# Altium PCB AthetiTech_PCB_V1.0.PcbDoc (part 3 of 3)
Units mm, origin at the board's own origin, x right, y up, seen from the top; angles counter-clockwise.
Board outline 50 x 35 mm, 2 copper layers (Top Layer, Bottom Layer); 161 components, 122 nets, 602 pads, 2 vias.
Unrouted connection lines stored in the file: 390.
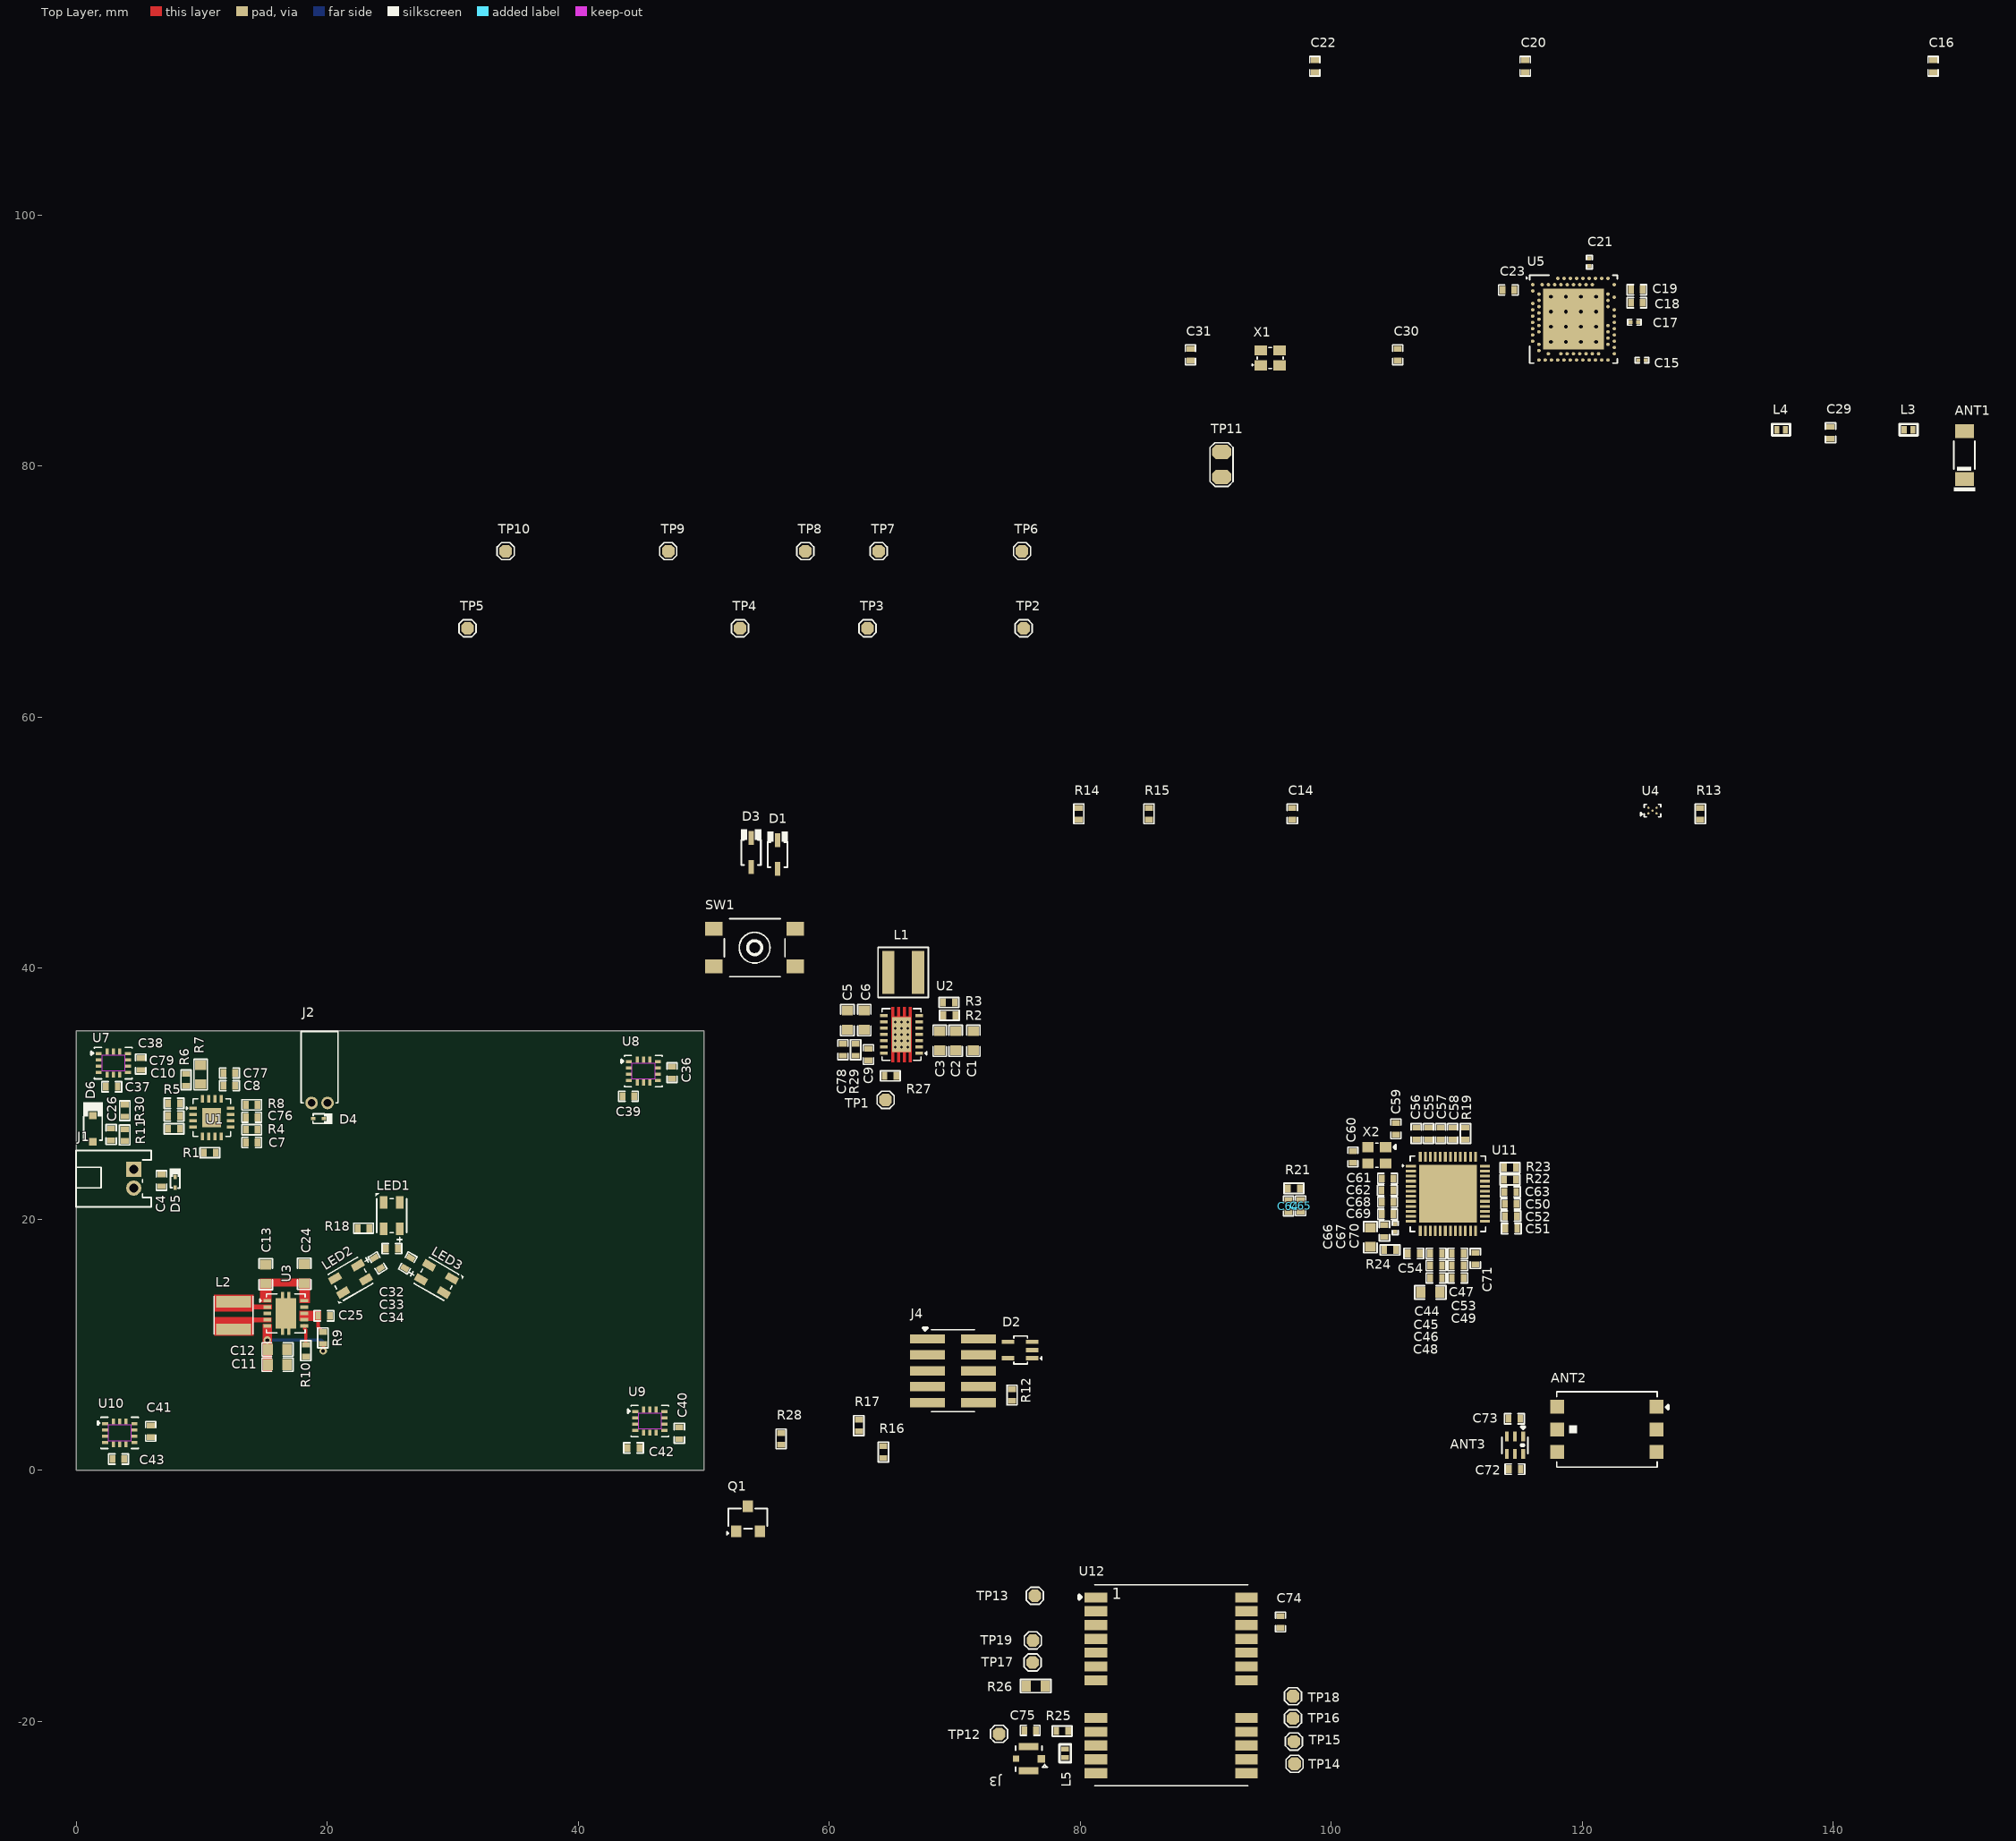
[diagram p0: Top Layer view]

## Part data (continued)
R28: library part CRCW04021K00FKEDHP, "RES SMD 1K OHM 1% 1/5W 0402", Case Code (Imperial)=0402, Case Code (Metric)=1005, LCSC Part Number=C313354, Manufacturer="Vishay Dale", Max Operating Temperature=155°C, Max Power Dissipation=125mW, Min Operating Temperature=-55°C, Package Quantity=10, Resistance=1kR, Resistance Tolerance=1%, Resistor Type="Thick Film", Supplier Part Number 1=541-1.00KYCT-ND, Temperature Coefficient=100ppm/°C, Voltage Rating=50V, Case/Package=0402, ComponentLink1Description=http://www.farnell.com/datasheets/2339608.pdf?src-supplier=Element14, ComponentLink1URL=http://www.farnell.com/datasheets/2339608.pdf?src-supplier=Element14, ComponentLink2Description=http://www.vishay.com/docs/20043/crcwhpe3.pdf?src-supplier=Digi-Key, ComponentLink2URL=http://www.vishay.com/docs/20043/crcwhpe3.pdf?src-supplier=Digi-Key, ComponentLink3Description=http://www.mouser.com/ds/2/427/crcwhpe3-46056.pdf?src-supplier=Mouser, ComponentLink3URL=http://www.mouser.com/ds/2/427/crcwhpe3-46056.pdf?src-supplier=Mouser, ComponentLink4Description=http://www.vishay.com/docs/20043/crcwhpe3.pdf?src-supplier=Avnet, ComponentLink4URL=http://www.vishay.com/docs/20043/crcwhpe3.pdf?src-supplier=Avnet, ComponentLink5Description=http://www.vishay.com/docs/20043/crcwhpe3.pdf?src-supplier=Future+Electronics, ComponentLink5URL=http://www.vishay.com/docs/20043/crcwhpe3.pdf?src-supplier=Future+Electronics, Construction=Rectangular, Contact Plating=Tin, Depth=0.5mm, Features="Automotive AEC-Q200", Height=0.3mm, Lead Free="Lead Free", Length=1mm, Manufacturer Part Number=CRCW04021K00FKEDHP, Military Standard=Not, Mount="Surface Mount", Number of Pins=2, Number of Terminations=2, Packaging="Tape and Reel", Power Rating=125mW, Pricing 1="1=0.15, 10=0.132, 100=0.0506, 1000=0.02226, 2500=0.01923, 5000=0.0172 (USD)", Radiation Hardening=No, REACH SVHC=Unknown, RoHS Compliant=Yes, Series=CRCW-HP, Size Code=0402, Stock 1=315989, Supplier 1=Digi-Key, Technology="THICK FILM", Termination=SMD/SMT, Tolerance=1%, Voltage Rating (DC)=50V, Weight=2.3E-05oz, Width=0.5mm
SW1: "No NO 50mA 4.5mm 100000 260gf 12V -30℃~+85℃ 4.5mm 4.3mm Black Round Button Brick nogging SPST SMD Tactile Switches ROHS", LCSC Part Number=C381037, Manufacturer="XKB Connectivity", Package=Custom, ComponentLink1Description=LCSC, ComponentLink1URL=https://www.lcsc.com/product-detail/Tactile-Switches_XKB-Connectivity-TS-1109S-C-B_C381037.html, Item Type=Switch, Manufacturer Part Number=TS-1109S-C-B
TP1 TP2 TP3 TP4 TP5 TP6 TP7 TP8 TP9 TP10 TP12 TP13 TP14 TP15 TP16 TP17 TP18 TP19: "Test Point ON", Item Type="Test Point", Manufacturer Part Number="TEST POINT 0.5mm Dia"
TP11: "Wire Connecting Pad", Item Type="Test Point", Manufacturer Part Number="2 Test Pad"
U1: "IC BATT CHG LI-ION 1CELL 16QFN", LCSC Part Number=C2865459, Manufacturer="Texas Instruments", ComponentLink1Description=https://datasheet.ciiva.com/15114/getdatasheetpartid-313264-15114609.pdf?src-supplier=Verical, ComponentLink1URL=https://datasheet.ciiva.com/15114/getdatasheetpartid-313264-15114609.pdf?src-supplier=Verical, ComponentLink2Description=https://datasheet.ciiva.com/1932/bq24072-1932354.pdf?src-supplier=Digikey, ComponentLink2URL=https://datasheet.ciiva.com/1932/bq24072-1932354.pdf?src-supplier=Digikey, ComponentLink3Description=https://datasheet.ciiva.com/1932/bq24072-1932355.pdf?src-supplier=Digikey, ComponentLink3URL=https://datasheet.ciiva.com/1932/bq24072-1932355.pdf?src-supplier=Digikey, ComponentLink4Description=https://datasheet.ciiva.com/1932/bq24072-1932356.pdf?src-supplier=Digikey, ComponentLink4URL=https://datasheet.ciiva.com/1932/bq24072-1932356.pdf?src-supplier=Digikey, ComponentLink5Description=https://datasheet.ciiva.com/3214/bq24079-3214045.pdf?src-supplier=Avnet, ComponentLink5URL=https://datasheet.ciiva.com/3214/bq24079-3214045.pdf?src-supplier=Avnet, ComponentLink6Description=https://datasheet.ciiva.com/1136/1857100-1136583.pdf?src-supplier=Element14, ComponentLink6URL=https://datasheet.ciiva.com/1136/1857100-1136583.pdf?src-supplier=Element14, ComponentLink7Description=https://datasheet.ciiva.com/46397/1885912-46397205.pdf?src-supplier=Element14, ComponentLink7URL=https://datasheet.ciiva.com/46397/1885912-46397205.pdf?src-supplier=Element14, Item Type=IC, Manufacturer Part Number=BQ24075RGTT, Pricing="1=2.63, 10=1.96, 50=1.8, 100=1.61, 1000=1.38, 10000=1.3 (USD)", RoHS=Yes, Stock=350, Supplier=Mouser
U2: "IC REG BUCK-BST ADJ 3.5A 14VSON", Case/Package=VSON, LCSC Part Number=C15483, Manufacturer="Texas Instruments", Max Operating Temperature=85°C, Max Output current=3A, Max Output Voltage=5.5V, Min Input Voltage=1.8V, Min Operating Temperature=-40°C, Min Output Voltage=1.2V, Package Quantity=3000, Quiescent Current=50uA, Supplier Part Number=595-TPS63020DSJR, Switching Frequency=2.4MHz, Category="Voltage Regulators - Switching", ComponentLink1Description=https://datasheet.ciiva.com/29733/tps63021-29733058.pdf?src-supplier=Digi-Key, ComponentLink1URL=https://datasheet.ciiva.com/29733/tps63021-29733058.pdf?src-supplier=Digi-Key, ComponentLink2Description=https://datasheet.ciiva.com/29733/tps63020-29733142.pdf?src-supplier=Digi-Key, ComponentLink2URL=https://datasheet.ciiva.com/29733/tps63020-29733142.pdf?src-supplier=Digi-Key, ComponentLink3Description=https://datasheet.ciiva.com/3221/tps63020-3221509.pdf?src-supplier=Avnet, ComponentLink3URL=https://datasheet.ciiva.com/3221/tps63020-3221509.pdf?src-supplier=Avnet, Efficiency=96%, Item Type=IC, Lead Free="Lead Free", Manufacturer Part Number=TPS63020DSJR, Max Supply Voltage=5.5V, Min Supply Voltage=1.8V, Mounting Technology="Surface Mount", Number of Outputs=1, Operating Supply Voltage=5.5V, Output Configuration=Positive, Output Current=3A, Output Type=Adjustable, Output Voltage=5.5V, Packaging="Tape and Reel", Pins=14, Pricing="1=2.8, 10=2.43, 50=2.43, 100=2.07, 1000=1.46, 10000=1.36 (USD)", Reach SVHC Compliant=No, RoHS=Yes, RoHS Compliant=Yes, Series=-, Stock=18181, Supplier=Mouser, Supply Current=50uA, Synchronous Rectifier=Yes, Topology=Buck-Boost
U3: "IC REG BUCK-BOOST 5V 1.6A 10VSON", Case/Package=VSON, LCSC Part Number=C116655, Manufacturer="Texas Instruments", Max Operating Temperature=85°C, Max Output current=1.2A, Max Output Voltage=5V, Max Supply Voltage=5.5V, Min Input Voltage=1.8V, Min Operating Temperature=-40°C, Package Quantity=3000, Quiescent Current=30uA, Switching Frequency=1.5MHz, ComponentLink1Description=https://datasheet.ciiva.com/22684/1831174-22684659.pdf?src-supplier=Element14, ComponentLink1URL=https://datasheet.ciiva.com/22684/1831174-22684659.pdf?src-supplier=Element14, ComponentLink2Description=https://datasheet.ciiva.com/2025/tps63001-2025822.pdf?src-supplier=Digikey, ComponentLink2URL=https://datasheet.ciiva.com/2025/tps63001-2025822.pdf?src-supplier=Digikey, ComponentLink3Description=https://datasheet.ciiva.com/2025/tps63001-2025821.pdf?src-supplier=Digikey, ComponentLink3URL=https://datasheet.ciiva.com/2025/tps63001-2025821.pdf?src-supplier=Digikey, ComponentLink4Description=https://datasheet.ciiva.com/2025/tps63001-2025823.pdf?src-supplier=Digikey, ComponentLink4URL=https://datasheet.ciiva.com/2025/tps63001-2025823.pdf?src-supplier=Digikey, ComponentLink5Description=https://datasheet.ciiva.com/14303/tps63001-14303726.pdf?src-supplier=Avnet, ComponentLink5URL=https://datasheet.ciiva.com/14303/tps63001-14303726.pdf?src-supplier=Avnet, Efficiency=96%, Item Type=IC, Lead Free="Lead Free", Manufacturer Part Number=TPS63002DRCR, Min Output Voltage=5V, Nominal Output Voltage=5V, Number of Outputs=1, Operating Supply Voltage=5.5V, Output Configuration=Positive, Output Current=1.2A, Output Type=Fixed, Output Voltage=5V, Packaging="Tape and Reel", Pins=10, Pricing="1=2.5, 10=2.16, 50=2.16, 100=1.81, 1000=1.23, 10000=1.07 (USD)", Reach SVHC Compliant=No, RoHS=Yes, RoHS Compliant=Yes, Series=-, Stock=1610, Supplier=Mouser, Synchronous Rectifier=Yes, Topology=Buck-Boost, Weight=0.000921oz
U4: "XENSIV 3D MAGNETIC HALL SENSOR S", LCSC Part Number=C3715865, Manufacturer="Infineon Technologies", Package=WLCSP-5(0.9x1.1), ComponentLink1Description=LCSC, ComponentLink1URL=https://www.lcsc.com/product-detail/Linear-Hall-Sensors_Infineon-Technologies-TLV493DA2BWXTMA1_C3715865.html?s_z=n_TLV493DA2BWXTMA1, Item Type=IC, Manufacturer Part Number=TLV493DA2BWXTMA1
U5: "IC RF TXRX+MCU 802.15.4 73QFN", Case/Package=QFN, Current - Receiving=5.2mA, Current - Transmitting=14.8mA, Frequency=2.4GHz, LCSC Part Number=C190794, Manufacturer="Nordic Semiconductor", ComponentLink1Description=https://www.nordicsemi.com/-/media/DocLib/Other/Product_Spec/nRF52840PSv11pdf.pdf?src-supplier=Digikey, ComponentLink1URL=https://www.nordicsemi.com/-/media/DocLib/Other/Product_Spec/nRF52840PSv11pdf.pdf?src-supplier=Digikey, Data Rate=2Mbps, Interface=SPI,USB,ADC,PWM,UART, Item Type=IC, Manufacturer Part Number=NRF52840-QIAA-R7, Memory Size=256KB, Mounting Technology="Surface Mount", Number of GPIO=48, Pricing="1=5.48 (USD)", RoHS=Yes, Sensitivity=-103dBm, Series=-, Stock=9952, Supplier=Digikey
U7 U8 U9 U10: "6 AXIS MEMES SENSOR", LCSC Part Number=C22459454, Manufacturer="TDK InvenSense", Item Type=IC, Manufacturer Part Number=ICM-45686, Pricing="1=5.86, 5=5.27, 10=5.052, 25=4.7908, 50=4.6122, 100=4.4484, 500=4.11884, 1000=3.99605 (USD)", RoHS=No, Stock=19377, Supplier=Digikey
U11: "IC RF TXRX 802.15.4 48QFN", LCSC Part Number=C5241969, Manufacturer=Qorvo, ComponentLink1Description=https://datasheet.octopart.com/DW1000-I-TR13-Qorvo-datasheet-147457540.pdf?src-supplier=RFMW, ComponentLink1URL=https://datasheet.octopart.com/DW1000-I-TR13-Qorvo-datasheet-147457540.pdf?src-supplier=RFMW, Item Type=IC, Manufacturer Part Number=DW1000-I-TR13, Pricing="1=9.63, 10=9.63, 50=8.58, 100=7.88, 1000=6.13, 10000=4.55 (USD)", RoHS=No, Stock=7464, Supplier=Mouser
U12: "M9 STANDARD PRECISION GNSS MOD", Manufacturer=u-blox, Item Type=Module, Manufacturer Part Number=NEO-M9N-00B, Pricing="250=15.92583, 500=15.54578, 1000=15.17333, 1500=14.79716, 2000=14.42092 (USD)", RoHS=Yes, Stock=250, Supplier=Avnet, Supplier Part Number=NEO-M9N-00B
X1: library part ECS-320-12-37B2-CKM-TR, "CRYSTAL 32 MHZ 12PF SMD", Manufacturer="ECS International", Supplier Part Number=50-ECS-320-12-37B2-CKM-TRCT-ND, Item Type=Crystal, Manufacturer Part Number=ECS-320-12-37B2-CKM-TR, Pricing="1=0.38, 10=0.327, 50=0.2962, 100=0.2839, 500=0.25738, 1000=0.24673 (USD)", RoHS=No, Supplier=Digikey
X2: library part XC21M4-38.400-F10NNHPK, "CRYSTAL 38.4MHZ 10PF SMD", LCSC Part Number=-, Manufacturer="Suzhou Hangjing Elec&Tech Co.,Ltd", Package="4-SMD, No Lead", ComponentLink1Description=LCSC, Item Type=Crystal, Manufacturer Part Number=XC21M4-38.400-F10NNHPK

## Via types
v1: diameter 0.6, hole 0.3, Top Layer to Bottom Layer, 2 vias

## Nets (pads, with @x,y where several pads share a name; then routed paths per layer and width w, separated by ;. In a path a pad name is that pad's centre, name@x,y a point inside that pad or via, vN(x,y) a via of type N, cw(c..) or ccw(c..) an arc to the next point about the centre after c; other vN are vias at no path point)
5V_BOOST: C13.2 C24.2 C32.1 C33.1 C34.1 LED1.2 LED2.2 LED3.2 R16.1 U3.1 U3.10
+3V3: C1.2 C2.2 C3.2 C14.2 C20.1 C36.2 C37.2 C38.2 C39.2 C40.2 C41.2 C42.2 C43.2 C74.2 J4.01 Q1.1 R2.2 R13.2 R14.2 R15.2 R17.1 R27.1 U2.4 U2.5 U4.C3 U5.A22 U5.AD14 U5.AD23 U5.B1 U5.W1 U5.Y2 U7.5 U7.8 U7.9 U7.12 U8.5 U8.8 U8.9 U8.12 U9.5 U9.8 U9.9 U9.12 U10.5 U10.8 U10.9 U10.12 U12.2 U12.22 U12.23
+5V: C8.2 C22.1 C77.2 D4.1 J2.1 U1.13 U5.AD2
"BAT STATUS READ": R1.1 U1.7 U5.H2
BAT_nRF: R4.1 U1.9 U5.V23
BATT_ADC: C26.2 D6.2 R11.1 R30.1 U5.K2
BOOST_ENABLE: R10.2 U3.6 U5.J1 | length 1.6
  Top Layer w0.254: U3.6 18.163,11.301 18.288,11.176 R10.2
DEC3: C19.2 U5.D23
DEC4_6: C15.1 C18.2 U5.B5 U5.E24
EN_3V3: C78.2 D1.1 D3.1 R29.1 U2.12
EXTINT0: U5.AC11 U12.4
EXTON: U5.AC19 U11.21
GND: ANT3.2 ANT3.5 C1.1 C2.1 C3.1 C4.2 C5.1 C6.1 C7.2 C8.1 C9.1 C10.2 C11.1 C12.1 C13.1 C14.1 C15.2 C16.2 C17.1 C18.1 C19.1 C20.2 C21.2 C22.2 C23.2 C24.1 C25.2 C26.1 C29.1 C30.1 C31.2 C32.2 C33.2 C34.2 C36.1 C37.1 C38.1 C39.1 C40.1 C41.1 C42.1 C43.1 C44.1 C45.1 C46.1 C47.2 C48.1 C49.1 C50.1 C51.1 C52.1 C53.1 C54.1 C55.1 C56.1 C57.1 C58.2 C59.1 C60.2 C61.2 C62.2 C63.2 C67.1 C68.1 C69.1 C71.2 C74.1 C76.1 C77.1 C78.1 C79.1 D2.2 D4.2 D5.2 D6.1 J1.2 J2.2 J3.S1 J3.S2 J3.S3 J4.03 J4.05 L4.1 LED1.4 LED2.4 LED3.4 R3.1 R6.2 R7.1 R8.1 R10.1 R19.2 R20.1 R26.2 R29.2 R30.2 TP10.1 U1.4 U1.6 U1.8 U1.14 U1.15 U1.17 U2.2 U2.15 U3.3 U3.9 U3.11 U4.C1 U5.74 U5.B7 U5.F23 U7.6 U8.6 U9.6 U10.6 U11.22 U11.32 U11.43 U11.46 U11.49 U12.10 U12.12 U12.13 U12.24 X1.2 X1.4 X2.2 X2.4
GPIO0: U5.B19 U11.38
GPIO1: U5.A16 U11.37
GPIO2: U5.AD10 U11.36
GPIO3: U5.AD8 U11.35
GPIO4: U5.Y23 U11.34
GPIO5: R22.2 U5.U24 U11.33
GPIO6: R23.1 U5.P2 U11.30
INT2: U5.A12 U8.4
INT3: U5.N1 U10.4
INT4: U5.AD18 U9.4
INTB: R13.1 U4.A1 U5.AC21 U7.4
IRQ: R19.1 U5.P23 U11.45
LED_DIN_3V3: Q1.2 R17.2 U5.B11
LED_DIN_5V: R18.2 R28.1
MAS_CLK: U5.G1 U7.3 U8.3 U9.3 U10.3
MAS_DA: U5.A14 U7.2 U8.2 U9.2 U10.2
MCU_3V3_EN: D1.2 U5.A10
NetANT1_1: ANT1.1 L3.1
NetANT2_5: ANT2.5 ANT3.1
NetANT3_3: ANT3.3 C73.1
NetANT3_4: ANT3.4 C72.1
NetC9_2: C9.2 U2.1 U2.13
NetC16_1: C16.1 U5.AC5
NetC17_2: C17.2 U5.N24
NetC21_1: C21.1 U5.A18
NetC23_1: C23.1 U5.C1
NetC25_1: C25.1 R9.1 U3.7 U3.8 | length 1.5
  Top Layer w0.254: C25.1 19.266,11.419 19.469,11.216 19.469,11.112 19.556,11.026 R9.1@19.66,11.026
NetC29_2: C29.2 L3.2 L4.2 U5.H23
NetC57_2: C57.2 U11.44
NetC58_1: C58.1 U11.42
NetC60_1: C60.1 U11.4 X2.3
NetC61_1: C61.1 U11.6
NetC62_1: C62.1 U11.7
NetC63_1: C63.1 R22.1 R23.2 U11.31
NetC64_1: C64.1 C65.1 C68.2 U11.9
NetC64_2: C64.2 R21.1
NetC65_2: C65.2 R21.2 U11.8
NetC66_1: C66.1 R24.2
NetC66_2: C66.2 C67.2 C70.2 U11.11
NetC69_2: C69.2 U11.10
NetC70_1: C70.1 R24.1 U11.12
NetC71_1: C71.1 U11.20
NetC75_1: C75.1 TP12.1
NetC75_2: C75.2 L5.1 R25.1
NetD3_2: D3.2 SW1.3 SW1.4
NetJ4_10: J4.10 R12.2
NetL1_1: L1.1 U2.8 U2.9
NetL1_2: L1.2 U2.6 U2.7
NetL2_1: L2.1 U3.4
NetL2_2: L2.2 U3.2
NetLED1_1: LED1.1 R18.1
NetLED1_3: LED1.3 LED2.1
NetLED2_3: LED2.3 LED3.1
NetQ1_3: Q1.3 R16.2 R28.2
NetR2_1: R2.1 R3.2 U2.3
NetR5_2: R5.2 U1.5
NetR6_1: R6.1 U1.1
NetR7_2: R7.2 U1.16
NetR8_2: R8.2 U1.12
NetR20_2: R20.2 U11.5
NetR26_1: R26.1 U12.7
NetTP11_1: TP11.1 U5.AD6
NetTP11_2: TP11.2 U5.AD4
NetTP13_1: TP13.1 U12.1
NetTP14_1: TP14.1 U12.14
NetTP15_1: TP15.1 U12.15
NetTP16_1: TP16.1 U12.16
NetTP18_1: TP18.1 U12.17
P0.07_TRACECLK: TP6.1 U5.M2
P0.11_TRACEDATA2: TP4.1 U5.T2
P0.12_TRACEDATA1: TP3.1 U5.U1
P1.00_TRACEDATA0/SWO: D2.1 J4.06 TP5.1 U5.AD22
P1.09_TRACEDATA3: TP2.1 U5.R1
P_GOOD: R27.2 TP1.1 U2.14
PPS: U5.B13 U12.3
RESET: D2.5 R12.1 TP9.1 U5.AC13
RF_IN: J3.1 L5.2 U12.11
RF_N: C73.2 U11.17
RF_P: C72.2 U11.16
RSTn: U5.T23 U11.27
RXD_SPIMOSI: U5.R24 U12.21
SCL: R15.1 U4.B2 U5.B15 U7.13 U8.13 U9.13 U10.13 U12.19
SDA: R14.1 U4.A3 U5.A20 U7.14 U8.14 U9.14 U10.14 U12.18
SDO: U5.B17 U7.1 U8.1 U9.1 U10.1
SPICLK: U5.AC9 U11.41
SPICsn: U5.AC17 U11.24
SPIMISO: U5.AD12 U11.40
SPIMOSI: U5.AD16 U11.39
SWDCLK: D2.3 J4.04 TP8.1 U5.AA24
SWDIO: D2.4 J4.02 TP7.1 U5.AC24
SYNC: U5.W24 U11.29
TXD_SPIMISO: U5.J24 U12.20
USB_D+: TP17.1 U12.6
USB_D-: TP19.1 U12.5
VBATT: C4.1 C10.1 C79.2 D5.1 J1.1 R11.2 U1.2 U1.3
VBATT/5V: C5.2 C6.2 C7.1 C11.2 C12.2 C76.2 R1.2 R4.2 R5.1 R9.2 SW1.1 SW1.2 U1.10 U1.11 U2.10 U2.11 U3.5 | length 5.8
  Top Layer w0.254: v1(19.66,9.5) R9.2
  Bottom Layer w0.254: v1(15.215,10.363) 19.511,10.363 19.66,10.214 v1(19.66,9.5)
VCC_RF: R25.2 U12.9
VDDAON: C51.2 U11.25
VDDBAT: C55.2 U11.47
VDDIOA: C50.2 U11.28
VDDLDOA: C56.2 U11.48
VDDLDOD: C52.2 U11.26
VDDLNA: C54.2 U11.15
VDDPA1: C44.2 C45.2 C46.2 C48.2 U11.18
VDDPA2: C47.1 C49.2 C53.2 U11.19
WAKEUP: U5.AD20 U11.23
XC1: C30.2 U5.B24 X1.1
XC2: C31.1 U5.A23 X1.3
XTAL1: C59.2 U11.3 X2.1
pads on no net: ANT1.2 ANT2.1 ANT2.2 ANT2.3 ANT2.4 ANT2.6 ANT3.6 J4.07 J4.08 J4.09 LED3.3 U5.74_1 U5.74_2 U5.74_3 U5.74_4 U5.74_5 U5.74_6 U5.74_7 U5.74_8 U5.74_9 U5.74_10 U5.74_11 U5.74_12 U5.74_13 U5.74_14 U5.74_15 U5.74_16 U5.A8 U5.AB2 U5.AC15 U5.B3 U5.B9 U5.D2 U5.F2 U5.L1 U5.L24 U7.7 U7.10 U7.11 U8.7 U8.10 U8.11 U9.7 U9.10 U9.11 U10.7 U10.10 U10.11 U11.1 U11.2 U11.13 U11.14 U12.8

## Other copper
Top Layer:
  rectangle net 5V_BOOST: 14.63,14.63 18.669,15.291
  rectangle net 5V_BOOST: 17.78,13.31 18.618,15.265
  rectangle net 5V_BOOST: 14.63,13.335 15.545,15.291
  rectangle net VBATT/5V: 14.834,7.899 15.596,11.633
  rectangle net NetC25_1: 17.78,11.887 19.507,12.7
  rectangle net NetL2_2: 10.973,12.649 14.148,13.995
  rectangle net NetL2_1: 10.998,10.693 14.122,12.217
  rectangle net NetL2_1: 11.1,11.786 15.57,12.167
  rectangle net NetL2_2: 11.125,12.802 15.596,13.208

## Silkscreen, mask and mechanical layers (free items; w line width, h text height)
Board Outline:
  the board outline again, w0.127

## Text inside footprints (layer, text, board x,y; h text height)
U12: Top Overlay "1" at 82.522,-10.596 h1.52